# Altium PCB Acoustics.PcbDoc (part 1 of 2)
Units mil, origin at the board's own origin, x right, y up, seen from the top; angles counter-clockwise.
Board outline 6000 x 4000 mil, 4 copper layers (Top Layer, Middle 1, Middle 2, Bottom Layer), stack 23.712 mil thick; 129 components, 90 nets, 526 pads, 20 vias.
Unrouted connection lines stored in the file: 224.
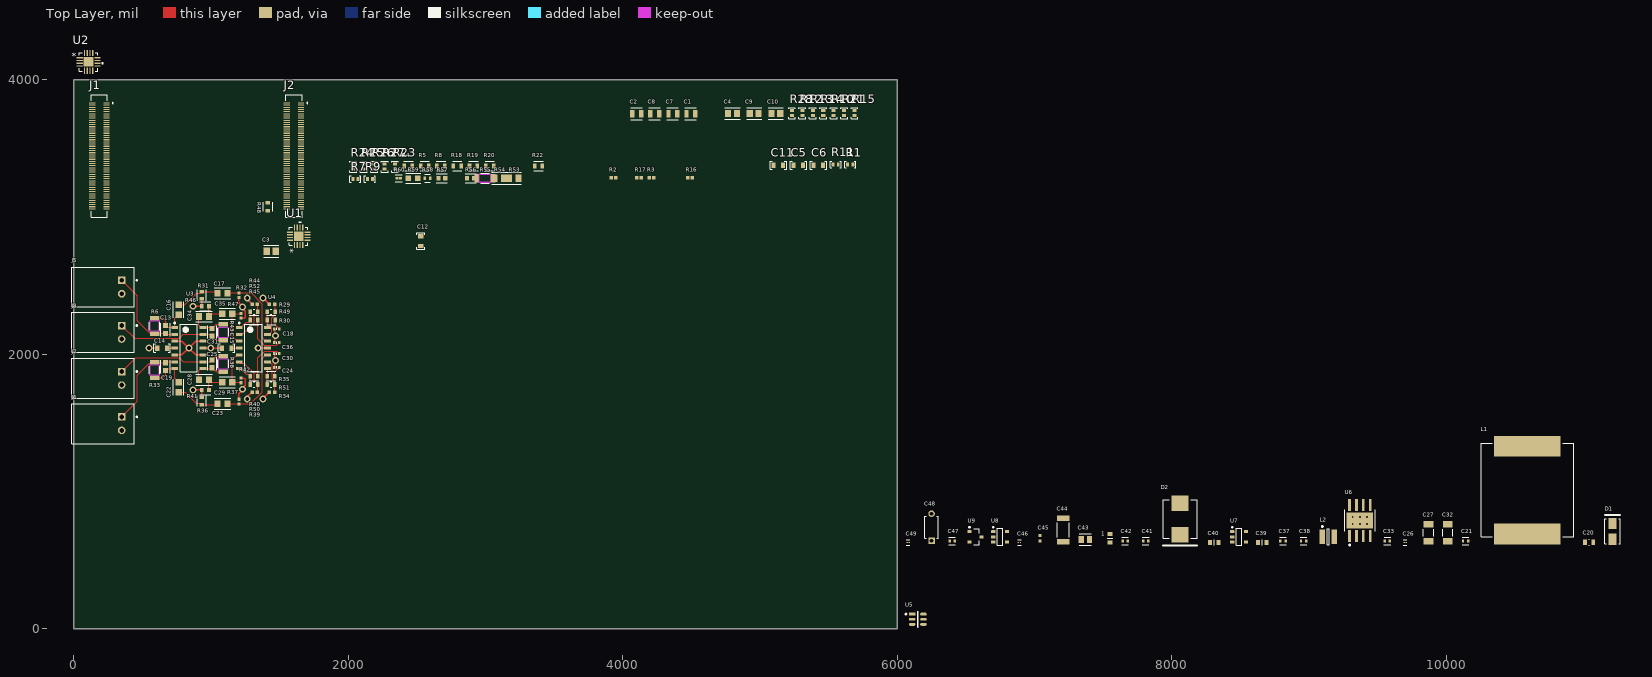
[diagram p0: Top Layer view]
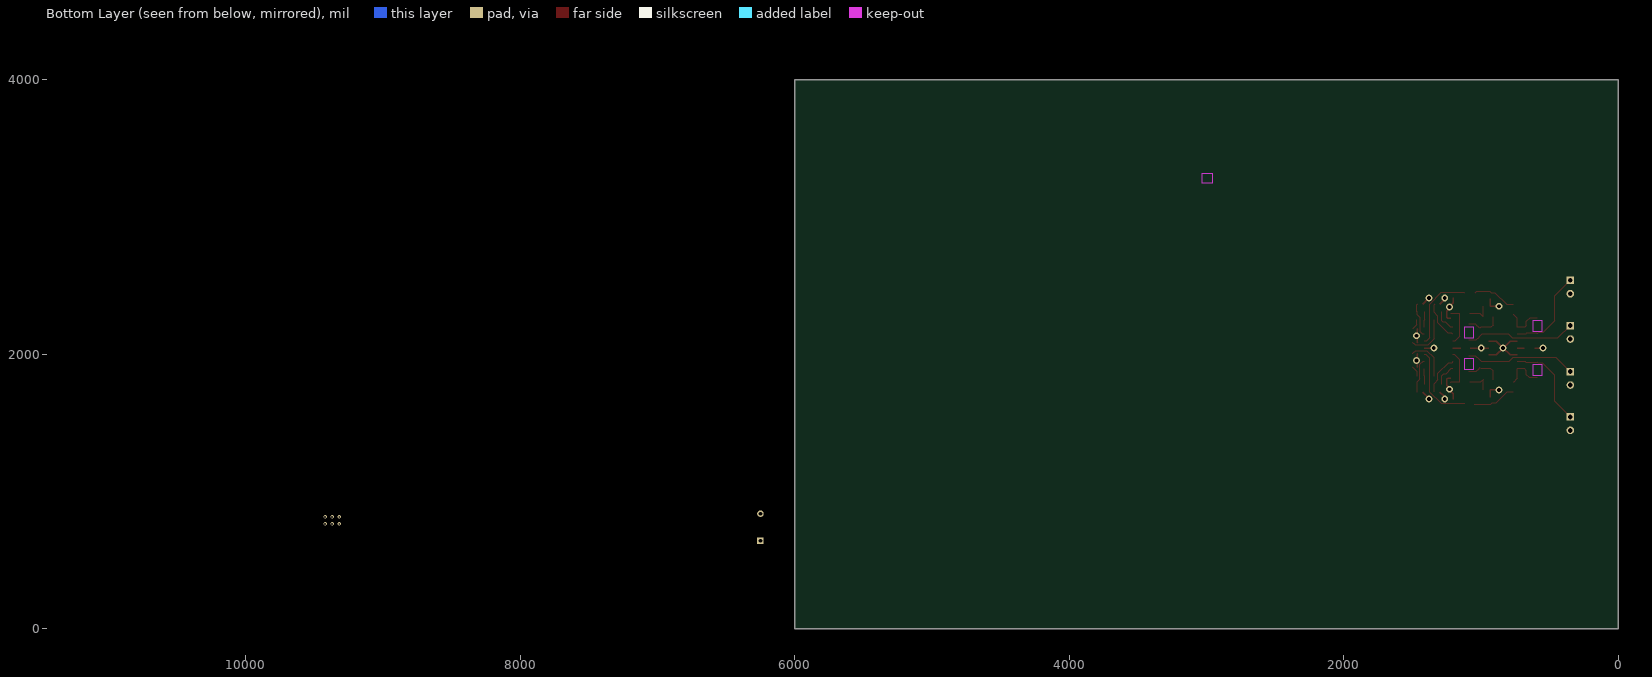
[diagram p1: Bottom Layer view, seen from below]
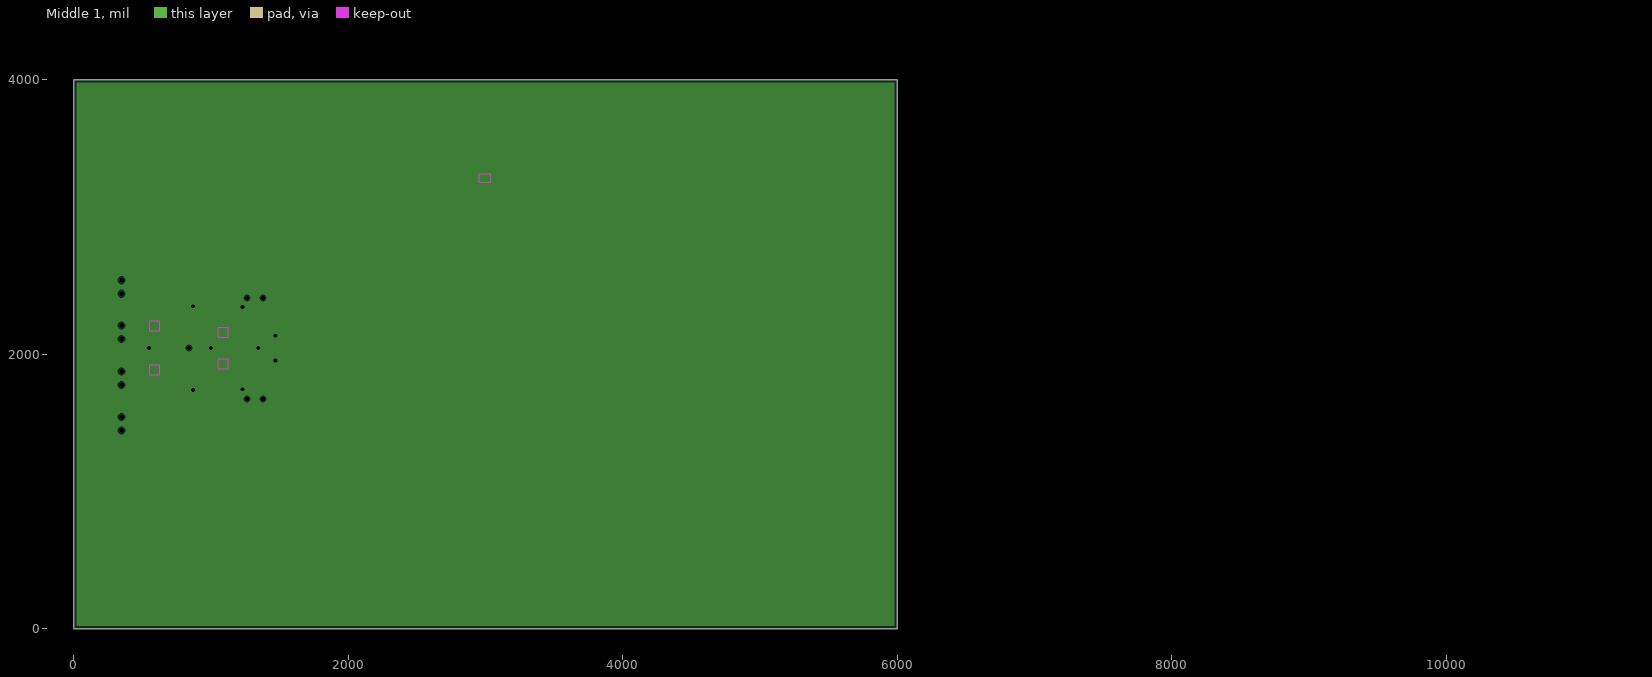
[diagram p2: Middle 1, clearances drawn from the general rule]
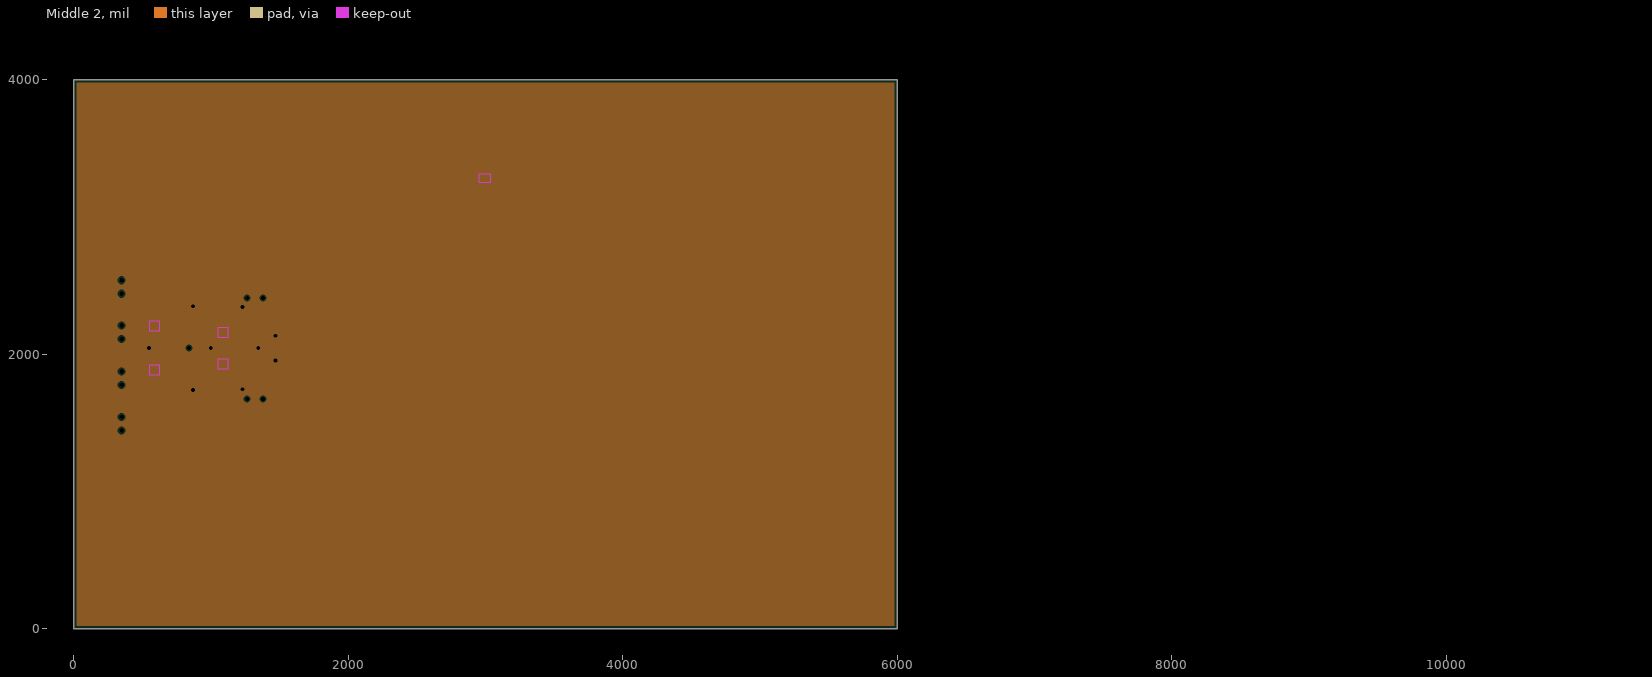
[diagram p3: Middle 2, clearances drawn from the general rule]

## Layer stack, top to bottom
Top Solder: solder mask 0.4, Solder Resist, Dk 3.5
Top Layer: signal copper 1.378
Dielectric 2: prepreg 2.8, PP-006, Dk 4.1
Middle 1: plane copper 1.378, net GND
Dielectric 1: dielectric 12.6, FR-4, Dk 4.8
Middle 2: plane copper 1.378, net GND
Dielectric 3: prepreg 2.8, PP-006, Dk 4.1
Bottom Layer: signal copper 1.378
Bottom Solder: solder mask 0.4, Solder Resist, Dk 3.5

## Board outline
0,0 6000,0 6000,4000 0,4000

## Design rules (kind name [scope] priority, off if disabled: settings)
AcuteAngle [All] p1: minimum=8.00000000000000E+0001 checktracksonly=FALSE
BoardOutlineClearance "BoardOutlineClearance JLCPCB" [All] p1: gap=11.81 ignorepadtopadclearanceinfootprint=FALSE
Clearance "Clearance JLCPCB 4 layer" [All] p1: gap=7.87 ignorepadtopadclearanceinfootprint=FALSE except(3.54: Arc-Arc Arc-Track Track-Track; 5: Arc-SMDPad Arc-Via Track-SMDPad Track-Via SMDPad-SMDPad; 9.45: THPad-THPad THPad-Via Via-Via; 10: Arc-Hole Track-Hole SMDPad-Hole THPad-Hole Via-Hole Fill-Hole Poly-Hole Region-Hole Text-Hole)
DiffPairsRouting "Diff Pairs USB 2.0" [InDifferentialPairClass('USB 2.0')] p1: maxlimit=5 minlimit=5 mostfreqgap=5 toplayer_minwidth=7.87 toplayer_maxwidth=7.87 toplayer_prefwidth=7.87 bottomlayer_minwidth=7.87 bottomlayer_maxwidth=7.87 bottomlayer_prefwidth=7.87 impedanceprofiledriven=TRUE impedanceprofileid={9C1C01C3-81FD-4AE1-9E3D-BC841176F5CA} maxuncoupledlength=500
DiffPairsRouting "Diff Pairs PCIe Gen 2" [InDifferentialPairClass('PCIe Gen 2')] p2: maxlimit=5 minlimit=5 mostfreqgap=5 toplayer_minwidth=5.53 toplayer_maxwidth=5.53 toplayer_prefwidth=5.53 bottomlayer_minwidth=5.53 bottomlayer_maxwidth=5.53 bottomlayer_prefwidth=5.53 impedanceprofiledriven=TRUE impedanceprofileid={D86E5A41-F98B-413D-93FD-A6E48D035561} maxuncoupledlength=500
HoleSize "HoleSize JLCPCB Pad" [IsPad] p1: absolutevalues=TRUE maxlimit=248.03 minlimit=19.68 maxpercent=80.000 minpercent=20.000
HoleSize "HoleSize JLCPCB 4 layer Cheap" [All] p2: absolutevalues=TRUE maxlimit=248.03 minlimit=11.81 maxpercent=80.000 minpercent=20.000
HoleToHoleClearance "HoleToHoleClearance JLCPCB Same Net" [All] p1: gap=10 allowstackedmicrovias=TRUE
MinimumAnnularRing "MinimumAnnularRing JLCPCB Via" [All] p1: minimumring=2.95
MinimumAnnularRing "MinimumAnnularRing JLCPCB Pad" [IsPad] p2: minimumring=9.84
MinimumAnnularRing "MinimumAnnularRing JLCPCB 1oz" [All] p3: minimumring=5.12
MinimumSolderMaskSliver "MinimumSolderMaskSliver JLCPCB" [All] p1: minsoldermaskwidth=3.94
PlaneClearance [All] p1: clearance=11.81
PlaneConnect [All] p1: planeconnectstyle=Direct reliefexpansion=20 reliefentries=4 reliefconductorwidth=10 reliefairgap=10
PolygonConnect [All] p1: connectstyle=Direct reliefconductorwidth=15 reliefentries=4 polygonreliefangle="45 Angle" airgapwidth=10
RoutingVias "RoutingVias JLCPCB 4 layer" [All] p1: holewidth=19.68 width=39.37 viastyle="Through Hole" minholewidth=11.81 minwidth=17.72 maxholewidth=50 maxwidth=80 useviatemplates=TRUE viatemplateguid#1={01536428-1517-4F41-8736-35C18B221FE6} viatemplatename#1=v63h33m63
SilkToSilkClearance [All] p1: silktosilkclearance=3
SilkToSolderMaskClearance "SilkToSolderMaskClearance JLCPCB" [IsPad] p1: minsilkscreentomaskgap=5.91 clearancetoexposedcopper=TRUE
SolderMaskExpansion "SolderMaskExpansion JLCPCB" [All] p1: expansion=1.5 istentingtop=FALSE
SupplyNets "Schematic Supply Nets_5" [InNet('3V3')] p1: voltage=0.000
SupplyNets "Schematic Supply Nets_4" [InNet('Filters 2.5V REF')] p2: voltage=0.000
SupplyNets "Schematic Supply Nets_3" [InNet('Filters + ADC Analog 5V')] p3: voltage=0.000
SupplyNets "Schematic Supply Nets_2" [InNet('GND')] p4: voltage=0.000
SupplyNets "Schematic Supply Nets_1" [InNet('J2 Connectors 5V digital pie')] p5: voltage=0.000
SupplyNets "Schematic Supply Nets" [InNet('VBUS')] p6: voltage=0.000
UnRoutedNet [All] p1: checkbadconnections=TRUE
Width "Width JLCPCB 4 layer" [All] p1: maxlimit=196.85 minlimit=3.54 preferedwidth=9.84 minimp=50.000000 maximp=50.000000 favimp=50.000000
21 further rules are at their usual default settings.

## Classes and differential pairs
component class Power_ACOUSTIC: 1 C20 C21 C26 C27 C32 C33 C37 C38 C39 C40 C41 C42 C43 C44 C45 C46 C47 C48 C49 D1 D2 F1 J3 J4 L1 L2 R53 R54 R55 R56 R57 R58 R59 R60 U5 U6 U7 U8 U9
component class Filters: C13 C14 C15 C16 C17 C18 C19 C22 C23 C24 C25 C28 C29 C30 C31 C34 C35 C36 R6 R29 R30 R31 R32 R33 R34 R35 R36 R37 R38 R39 R40 R41 R42 R43 R44 R45 R46 R47 R49 R50 R51 R52 U3 U4
component class Connectors: J1 J2 J5 J6 J7 J8
component class ADC: C1 C2 C3 C4 C5 C6 C7 C8 C9 C10 C11 C12 R1 R2 R3 R4 R5 R7 R8 R9 R10 R11 R12 R13 R14 R15 R16 R17 R18 R19 R20 R21 R22 R23 R24 R25 R26 R27 R28 R48 U1 U2
differential pair CAN: +CAN_P -CAN_N

## Components (designator, comment, footprint, x,y, rotation, side; value= is the part's Value field where it differs from the comment)
1 "47uF" FP-ZRB18A-0_2-MFG 7550,660 r90 top
C1 "CL21B106KOQNNNE" FP-CL21B106KOQNNNE-MFG 4496.49,3751.77 r0 top value=10uF
C2 "CL21B106KOQNNNE" FP-CL21B106KOQNNNE-MFG 4102.83,3751.77 r0 top value=10uF
C3 "GRM2195C1H103JA01D" FP-GRM219-0_1-IPC_B 1440,2750 r0 top
C4 "GRM2195C1H103JA01D" FP-GRM219-0_1-IPC_B 4799.51,3753.5 r0 top
C5 "10uF Ceramic 6.3V" CAPACITOR_0603 5279.67,3377.51 r0 top
C6 "10uF Ceramic 6.3V" CAPACITOR_0603 5425.67,3377.51 r0 top
C7 "CL21B106KOQNNNE" FP-CL21B106KOQNNNE-MFG 4365.27,3751.77 r0 top value=10uF
C8 "CL21B106KOQNNNE" FP-CL21B106KOQNNNE-MFG 4234.05,3751.77 r0 top value=10uF
C9 "GRM2195C1H103JA01D" FP-GRM219-0_1-IPC_B 4957.79,3753.5 r0 top
C10 "GRM2195C1H103JA01D" FP-GRM219-0_1-IPC_B 5116.06,3753.5 r0 top
C11 "10uF Ceramic 6.3V" CAPACITOR_0603 5133.67,3377.51 r0 top
C12 "10uF Ceramic 6.3V" CAPACITOR_0603 2530,2825 r90 top
C13 "Capacitor 22pF ±1% 110V 0603" FP-GCM188-0_1-IPC_B 670,2180 r90 top value=22pF
C14 "100nF Ceramic 25V" CAPACITOR_0603 645,2045 r180 top value=0.1uF
C15 "100nF Ceramic 25V" CAPACITOR_0603 1115,2045 r180 top value=0.1uF
C16 "Capacitor 0.1uF 2% 50V 0704" FP-GRMJN6-0_1-IPC_A 765,2325 r90 top value=100nF
C17 "Capacitor 0.1uF 2% 50V 0704" FP-GRMJN6-0_1-IPC_A 1085,2445 r0 top value=100nF
C18 "Capacitor 1nF +/-20% 50V 0402" CAPC0402(1005)33_L 1480,2185 r0 top value=1nF
C19 "Capacitor 22pF ±1% 110V 0603" FP-GCM188-0_1-IPC_B 670,1910 r270 top value=22pF
C20 "0.1 uF" FP-GRMJN6-0_1-MFG 11040,630 r0 top
C21 "10uf 50V" FP-ZRB15X-0_22-MFG 10140,640 r0 top
C22 "Capacitor 0.1uF 2% 50V 0704" FP-GRMJN6-0_1-IPC_A 765,1760 r270 top value=100nF
C23 "Capacitor 0.1uF 2% 50V 0704" FP-GRMJN6-0_1-IPC_A 1085,1640 r0 top value=100nF
C24 "Capacitor 1nF +/-20% 50V 0402" CAPC0402(1005)33_L 1480,1905 r0 top value=1nF
C25 "Capacitor 22pF ±1% 110V 0603" FP-GCM188-0_1-IPC_B 1010,1930 r270 top value=22pF
C26 "0.1uF" FP-GRM022-0_02-IPC_C 9700,630 r0 top
C27 "22uF" FP-GCJ31C-0_3-MFG 9870,700 r90 top
C28 "Capacitor 0.1uF 2% 50V 0704" FP-GRMJN6-0_1-IPC_A 950,1815 r0 top value=100nF
C29 "Capacitor 0.1uF 2% 50V 0704" FP-GRMJN6-0_1-IPC_A 1120,1795 r0 top value=100nF
C30 "Capacitor 1nF +/-20% 50V 0402" CAPC0402(1005)33_L 1480,2005 r0 top value=1nF
C31 "Capacitor 22pF ±1% 110V 0603" FP-GCM188-0_1-IPC_B 1010,2160 r90 top value=22pF
C32 "22uF" FP-GCJ31C-0_3-MFG 10010,700 r90 top
C33 "0.1uF" FP-ZRB15X-0_22-MFG 9570,640 r0 top
C34 "Capacitor 0.1uF 2% 50V 0704" FP-GRMJN6-0_1-IPC_A 950,2275 r0 top value=100nF
C35 "Capacitor 0.1uF 2% 50V 0704" FP-GRMJN6-0_1-IPC_A 1120,2295 r0 top value=100nF
C36 "Capacitor 1nF +/-20% 50V 0402" CAPC0402(1005)33_L 1480,2085 r0 top value=1nF
C37 "10uF" FP-ZRB15X-0_22-MFG 8810,640 r0 top
C38 "10uF" FP-ZRB15X-0_22-MFG 8960,640 r0 top
C39 "47uF" FP-ZRB18A-0_2-MFG 8660,630 r0 top
C40 "47uF" FP-ZRB18A-0_2-MFG 8310,630 r0 top
C41 "10uf Cap" FP-ZRB15X-0_22-MFG 7810,640 r0 top
C42 "2.2uF" FP-ZRB155-0_2-MFG 7660,640 r0 top
C43 "10nf" FP-C0805C103K8RACAUTO-MFG 7370,650 r0 top
C44 "68pF" WCAP-CSMH_1808_H1.25 7210,720 r90 top
C45 "4.7nF" WCAP-CSGP_0402_L1W0.5H0.5 7040,660 r90 top
C46 "0.1uF" FP-GRM022-0_02-IPC_C 6890,630 r0 top
C47 "10uF" FP-ZRB15X-0_22-MFG 6400,640 r0 top
C48 "1Uf" FP-RCE1K1-MFG 6250,740 r90 top
C49 "0.1uF" FP-GRM022-0_02-IPC_C 6080,630 r0 top
D1 "SMAJ22A" LFUS-DO-214AC-2_L 11210,710 r90 top
D2 "B560" DIOD-B5X0C-2_M 8060,800 r90 top
J1 "10164227-1004A1RLF" AMPHENOL_10164227-1004A1RLF 188.03,3444.41 r90 top
J2 "10164227-1004A1RLF" AMPHENOL_10164227-1004A1RLF 1605.35,3444.41 r90 top
J5 "S2B-XH-A-GU" FP-S2B-XH-A-GU-MFG 215,2490 r270 top
J6 "S2B-XH-A-GU" FP-S2B-XH-A-GU-MFG 215,1495 r270 top
J7 "S2B-XH-A-GU" FP-S2B-XH-A-GU-MFG 215,1825 r270 top
J8 "S2B-XH-A-GU" FP-S2B-XH-A-GU-MFG 215,2160 r270 top
L1 "15uH" FP-IHLP-6767GZ-FP_3_825x1-MFG 10590,1010 r90 top
L2 "4.7uH" BOUR-SRN3015-2_V 9140,670 r0 top
R1 "0 Ohm 1% 1/16W" RESISTOR_0402 5657.67,3382.51 r0 top
R2 "100m" RESC1005X40X25NL10T10 3932.75,3285.81 r0 top
R3 "100m" RESC1005X40X25NL10T10 4211.25,3285.81 r0 top
R4 "RMCF0603FT10R0" FP-RMCF0603-MFG 2439.21,3371.96 r0 top
R5 "RMCF0603FT10R0" FP-RMCF0603-MFG 2557.64,3371.96 r0 top
R6 "Resistor 47M 1% 0.3W 1206" RES_CRHA1206_VIS 590,2205 r90 top value=47M
R7 "0 Ohm 1% 1/16W" RESISTOR_0402 2053,3276.51 r0 top
R8 "RMCF0603FT10R0" FP-RMCF0603-MFG 2676.06,3371.96 r0 top
R9 "0 Ohm 1% 1/16W" RESISTOR_0402 2159,3276.51 r0 top
R10 "0 Ohm 1% 1/16W" RESISTOR_0402 5537.2,3757 r90 top
R11 "0 Ohm 1% 1/16W" RESISTOR_0402 5551.67,3382.51 r0 top
R12 "0 Ohm 1% 1/16W" RESISTOR_0402 5309.2,3757 r90 top
R13 "0 Ohm 1% 1/16W" RESISTOR_0402 5385.2,3757 r90 top
R14 "0 Ohm 1% 1/16W" RESISTOR_0402 5461.2,3757 r90 top
R15 "0 Ohm 1% 1/16W" RESISTOR_0402 5689.2,3757 r90 top
R16 "100m" RESC1005X40X25NL10T10 4489.76,3285.81 r0 top
R17 "100m" RESC1005X40X25NL10T10 4118.42,3285.81 r0 top
R18 "RMCF0603FT10R0" FP-RMCF0603-MFG 2794.49,3371.96 r0 top
R19 "RMCF0603FT10R0" FP-RMCF0603-MFG 2912.91,3371.96 r0 top
R20 "RMCF0603FT10R0" FP-RMCF0603-MFG 3031.34,3371.96 r0 top
R21 "0 Ohm 1% 1/16W" RESISTOR_0402 5613.2,3757 r90 top
R22 "RMCF0603FT10R0" FP-RMCF0603-MFG 3386.61,3371.96 r0 top
R23 "0 Ohm 1% 1/16W" RESISTOR_0402 2342,3367.51 r90 top
R24 "0 Ohm 1% 1/16W" RESISTOR_0402 2038,3367.51 r90 top
R25 "0 Ohm 1% 1/16W" RESISTOR_0402 2114,3367.51 r90 top
R26 "0 Ohm 1% 1/16W" RESISTOR_0402 2190,3367.51 r90 top
R27 "0 Ohm 1% 1/16W" RESISTOR_0402 2266,3367.51 r90 top
R28 "0 Ohm 1% 1/16W" RESISTOR_0402 5233.2,3757 r90 top
R29 "SG73P1ETTP1001F" RESC1005X40X25ML05T05 1445,2365 r180 top value=1k
R30 "RMCF0603FG22R0" FP-RMCF0603-MFG 1440,2250 r0 top value=22
R31 "Resistor 3.3k 1% 0.2W 0603" FP-AC0603-IPC_C 935,2430 r90 top value=3.3k
R32 "Resistor 33K 1% 0.063W 0402" RESC1005X40X25NL05T10 1205,2430 r90 top value=33k
R33 "Resistor 47M 1% 0.3W 1206" RES_CRHA1206_VIS 590,1885 r270 top value=47M
R34 "SG73P1ETTP1001F" RESC1005X40X25ML05T05 1445,1725 r180 top value=1k
R35 "RMCF0603FG22R0" FP-RMCF0603-MFG 1438.54,1840 r0 top value=22
R36 "Resistor 3.3k 1% 0.2W 0603" FP-AC0603-IPC_C 935,1660 r270 top value=3.3k
R37 "Resistor 33K 1% 0.063W 0402" RESC1005X40X25NL05T10 1205,1655 r270 top value=33k
R38 "Resistor 47M 1% 0.3W 1206" RES_CRHA1206_VIS 1090,1930 r270 top value=47M
R39 "SG73P1ETTP1001F" RESC1005X40X25ML05T05 1320,1725 r180 top value=1k
R40 "RMCF0603FG22R0" FP-RMCF0603-MFG 1315,1840 r0 top value=22
R41 "Resistor 3.3k 1% 0.2W 0603" FP-AC0603-IPC_C 960,1740 r0 top value=3.3k
R42 "Resistor 33K 1% 0.063W 0402" RESC1005X40X25NL05T10 1220,1810 r270 top value=33k
R43 "Resistor 47M 1% 0.3W 1206" RES_CRHA1206_VIS 1090,2160 r90 top value=47M
R44 "SG73P1ETTP1001F" RESC1005X40X25ML05T05 1320,2365 r180 top value=1k
R45 "RMCF0603FG22R0" FP-RMCF0603-MFG 1315,2250 r0 top value=22
R46 "Resistor 3.3k 1% 0.2W 0603" FP-AC0603-IPC_C 960,2350 r0 top value=3.3k
R47 "Resistor 33K 1% 0.063W 0402" RESC1005X40X25NL05T10 1220,2280 r90 top value=33k
R48 "RMCF0603FT10R0" FP-RMCF0603-MFG 1415,3075 r270 top
R49 "RT0603LRC07100KL" RESC1608X55N 1440,2310 r180 top value=100k
R50 "RT0603LRC07100KL" RESC1608X55N 1315,1780 r180 top value=100k
R51 "RT0603LRC07100KL" RESC1608X55N 1438.05,1780 r180 top value=100k
R52 "RT0603LRC07100KL" RESC1608X55N 1315,2310 r180 top value=100k
R53 "100k ohm" FP-RQ73C2A-IPC_B 3206.13,3281.87 r0 top
R54 "100k" FP-RQ73C2A-IPC_B 3101.49,3281.87 r0 top
R55 "20k" "MCA 1206_VIS" 2996.84,3281.87 r0 top
R56 "52.3K" FP-MCR03-IPC_C 2892.2,3281.87 r0 top
R57 "22k" FP-CRGP0603-IPC_C 2682.91,3281.87 r0 top value=22KΩ
R58 "162k" FP-RP73P-1E-MFG 2578.26,3281.87 r0 top value=162KΩ
R59 "10K" FP-AC0603-IPC_A 2473.61,3281.87 r0 top
R60 "20 Ohm" FP-AF0201-IPC_A 2368.97,3281.87 r0 top
U1 "ADS7253IRTET" WQFN-16 1640,2860 r90 top
U2 "ADS7253IRTET" WQFN-16 109.8,4129.8 r0 top
U3 "OPA4228UA" D0014A_L 840,2045 r0 top
U4 "OPA4228UA" D0014A_L 1310,2045 r0 top
U5 "TPS560430XFDBVR" FP-DBV0006A-IPC_C 6150,70 r0 top
U6 "TPS54560BDDAR" FP-DDA0008E-MFG 9370,790 r90 top
U7 "LP2985-50DBVRG4" DBV0005A_L 8490,670 r0 top
U8 "OPA376AIDBVR" DBV0005A_L 6750,670 r0 top
U9 "REF3025AIDBZR" DBZ0003A_L 6570,670 r0 top

## Footprints (in the part's own frame and the unit in brackets; to place one, negate y for a bottom-side part, rotate by r counter-clockwise, add the part's x,y. Pads: shape width x height; smd on the part's side, far side on the other; paste and mask are expansions set on the pad)
AMPHENOL_10164227-1004A1RLF [mm]
  rect 0.2x1.14 smd paste-2 mask+0: 1(9.8,-1.32) 2(9.8,1.32) 3(9.4,-1.32) 4(9.4,1.32) 5(9,-1.32) 6(9,1.32) 7(8.6,-1.32) 8(8.6,1.32) 9(8.2,-1.32) 10(8.2,1.32) 11(7.8,-1.32) 12(7.8,1.32) 13(7.4,-1.32) 14(7.4,1.32) 15(7,-1.32) 16(7,1.32) 17(6.6,-1.32) 18(6.6,1.32) 19(6.2,-1.32) 20(6.2,1.32) 21(5.8,-1.32) 22(5.8,1.32) 23(5.4,-1.32) 24(5.4,1.32) 25(5,-1.32) 26(5,1.32) 27(4.6,-1.32) 28(4.6,1.32) 29(4.2,-1.32) 30(4.2,1.32) 31(3.8,-1.32) 32(3.8,1.32) 33(3.4,-1.32) 34(3.4,1.32) 35(3,-1.32) 36(3,1.32) 37(2.6,-1.32) 38(2.6,1.32) 39(2.2,-1.32) 40(2.2,1.32) 41(1.8,-1.32) 42(1.8,1.32) 43(1.4,-1.32) 44(1.4,1.32) 45(1,-1.32) 46(1,1.32) 47(0.6,-1.32) 48(0.6,1.32) 49(0.2,-1.32) 50(0.2,1.32) 51(-0.2,-1.32) 52(-0.2,1.32) 53(-0.6,-1.32) 54(-0.6,1.32) 55(-1,-1.32) 56(-1,1.32) 57(-1.4,-1.32) 58(-1.4,1.32) 59(-1.8,-1.32) 60(-1.8,1.32) 61(-2.2,-1.32) 62(-2.2,1.32) 63(-2.6,-1.32) 64(-2.6,1.32) 65(-3,-1.32) 66(-3,1.32) 67(-3.4,-1.32) 68(-3.4,1.32) 69(-3.8,-1.32) 70(-3.8,1.32) 71(-4.2,-1.32) 72(-4.2,1.32) 73(-4.6,-1.32) 74(-4.6,1.32) 75(-5,-1.32) 76(-5,1.32) 77(-5.4,-1.32) 78(-5.4,1.32) 79(-5.8,-1.32) 80(-5.8,1.32) 81(-6.2,-1.32) 82(-6.2,1.32) 83(-6.6,-1.32) 84(-6.6,1.32) 85(-7,-1.32) 86(-7,1.32) 87(-7.4,-1.32) 88(-7.4,1.32) 89(-7.8,-1.32) 90(-7.8,1.32) 91(-8.2,-1.32) 92(-8.2,1.32) 93(-8.6,-1.32) 94(-8.6,1.32) 95(-9,-1.32) 96(-9,1.32) 97(-9.4,-1.32) 98(-9.4,1.32) 99(-9.8,-1.32) 100(-9.8,1.32)
  silkscreen extent -11.3,-2.6 11.3,1.5, body extent -11.3,-1.69 11.3,1.69, height 4.1
BOUR-SRN3015-2_V [mm] "SMD, 2-Leads, Body 3x3mm, Height 1.5mm"
  rect 1x2.7 smd: 1(-1.1,0) 2(1.1,0)
  silkscreen extent -1.22,-1.5 0.2,2.02, body extent -1.5,-1.5 1.5,1.5, height 1.5
CAPACITOR_0603 [mil] "CAPACITOR 0603"
  rect 30x40 smd: 1(-35,0) 2(35,0)
  silkscreen extent -60,-30 60,30, body extent -31,-16 32,16, height 31
CAPC0402(1005)33_L [mm] "Chip Capacitor, Body 1.0x0.5mm, Height 0.33mm, IPC High Density"
  rrect25% 0.5x0.55 smd: 1(-0.45,0) 2(0.45,0)
  silkscreen extent 0,-0.2 0,0.2, body extent -0.5,-0.25 0.5,0.25, height 0.55
D0014A_L [mm] "SOIC, 14-Leads, Body 8.75x4mm, Pitch 1.27mm, IPC High Density"
  rrect18% 1.25x0.55 smd: 1(-2.625,3.81) 2(-2.625,2.54) 3(-2.625,1.27) 4(-2.625,0) 5(-2.625,-1.27) 6(-2.625,-2.54) 7(-2.625,-3.81) 8(2.625,-3.81) 9(2.625,-2.54) 10(2.625,-1.27) 11(2.625,0) 12(2.625,1.27) 13(2.625,2.54) 14(2.625,3.81)
  silkscreen extent -2.75,-4.38 1.6,4.76, body extent -3.02,-4.32 3.02,4.32, height 1.59
DBV0005A_L [mm] "SOT23, 5-Leads, Body 3.05x1.75mm, Pitch 0.95mm, IPC High Density"
  rrect18% 0.8x0.55 smd: 1(-1.275,0.95) 2(-1.275,0) 3(-1.275,-0.95) 4(1.275,-0.95) 5(1.275,0.95)
  silkscreen extent -1.4,-1.55 0.5,1.9, body extent -1.42,-1.46 1.42,1.46, height 1.08
DBZ0003A_L [mm] "SOT23, 3-Leads, Body 3.04x1.4mm, Pitch 0.95mm, IPC High Density"
  rrect18% 0.8x0.55 smd: 1(-1.1,0.95) 2(-1.1,-0.95) 3(1.1,0)
  silkscreen extent -1.22,-1.5 0.7,1.9, body extent -1.26,-1.46 1.26,1.46, height 0.96
DIOD-B5X0C-2_M [mm] "Molded Diode, 2-Leads, Body 7.11x6.22mm, IPC Low Density"
  rect 2.85x3.2 smd: 1(-2.95,0) 2(2.95,0)
  silkscreen extent -4.87,-3.15 3.6,3.15, body extent -3.56,-3.11 3.55,3.11, height 2.63
FP-AC0603-IPC_A [mil]
  rect 41.68x39.85 smd paste+0 mask+0: 1(-34.52,0) 2(34.52,0)
  silkscreen extent -55,-36 55,36, body extent -75,-40 75,40, height 10
FP-AC0603-IPC_C [mil]
  rect 25.93x31.97 smd paste+0 mask+0: 1(-26.64,0) 2(26.64,0)
  silkscreen extent -40,-33 40,33, body extent -44,-22 44,22, height 10
FP-AF0201-IPC_A [mil]
  rect 21.82x18.22 smd paste+0 mask+0: 1(-13.95,0) 2(13.95,0)
  silkscreen extent -25,-25 25,25, body extent -33,-17 33,17, height 10
FP-C0805C103K8RACAUTO-MFG [mm]
  rect 0.95x1.35 smd paste+0 mask+0: 1(-0.75,0) 2(0.75,0)
  silkscreen extent -1.1,-1.05 1.1,1.05, body extent -1.4,-0.85 1.4,0.85, height 0.25
FP-CL21B106KOQNNNE-MFG [mm]
  rect 0.825x1.325 smd paste+0 mask+0: 1(-0.8,0) 2(0.8,0)
  silkscreen extent -1.13,-1.14 1.05,1.12, body extent -1.31,-0.8 1.31,0.8, height 0.25
FP-CRGP0603-IPC_C [mil]
  rect 29.85x31.97 smd paste+0 mask+0: 1(-24.68,0) 2(24.68,0)
  silkscreen extent -40,-33 40,33, body extent -44,-22 44,22, height 10
FP-DBV0006A-IPC_C [mm]
  rect 1.205x0.53 smd paste+0 mask+0: 1(-1.05,0.95)
  rrect100% 1.205x0.53 smd paste+0 mask+0: 2(-1.05,0) 3(-1.05,-0.95) 4(1.05,-0.95) 5(1.05,0) 6(1.05,0.95)
  silkscreen extent -2.33,-1.45 0.05,1.45, body extent -1.75,-1.55 1.75,1.55, height 0.25
FP-DDA0008E-MFG [mm]
  rect 2.2x0.5 smd paste-1000 mask+0: 1(-2.875,1.905) 2(-2.875,0.635) 3(-2.875,-0.635) 4(-2.875,-1.905) 5(2.875,-1.905) 6(2.875,-0.635) 7(2.875,0.635) 8(2.875,1.905)
  rect 2.95x4.9 smd paste-1000 mask-1000: 9(0,0)
  silkscreen extent -4.67,-2.83 2,2.83, body extent -4.08,-2.68 4.08,2.68, height 0.25
FP-GCJ31C-0_3-MFG [mm]
  rect 1.15x1.8 smd paste+0 mask+0: 1(-1.575,0) 2(1.575,0)
  silkscreen extent -0.63,-0.95 0.63,0.95, body extent -2.25,-1.05 2.25,1.05, height 0.25
FP-GCM188-0_1-IPC_B [mil]
  rect 37.74x35.91 smd paste+0 mask+0: 1(-28.61,0) 2(28.61,0)
  silkscreen extent -47,-34 47,34, body extent -57,-28 57,28, height 10
FP-GRM022-0_02-IPC_C [mil]
  rect 10.06x6.35 smd paste+0 mask+0: 1(-7.98,0) 2(7.98,0)
  silkscreen extent -13,-20 13,20, body extent -17,-8 17,8, height 10
FP-GRM219-0_1-IPC_B [mil]
  rect 45.58x53.63 smd paste+0 mask+0: 1(-32.57,0) 2(32.57,0)
  silkscreen extent -55,-43 55,43, body extent -65,-37 65,37, height 10
FP-GRMJN6-0_1-IPC_A [mil]
  rect 45.62x47.72 smd paste+0 mask+0: 1(-36.48,0) 2(36.48,0)
  silkscreen extent -59,-40 59,40, body extent -79,-44 79,44, height 10
FP-GRMJN6-0_1-MFG [mm]
  rect 0.7x1 smd paste+0 mask+0: 1(-0.775,0) 2(0.775,0)
  silkscreen extent -0.05,-0.55 0.05,0.55, body extent -1.22,-0.65 1.22,0.65, height 0.25
FP-IHLP-6767GZ-FP_3_825x1-MFG [mm]
  rect 3.825x12.32 smd paste+0 mask+0: 1(-8.117,0) 2(8.117,0)
  silkscreen extent -8.64,-8.57 8.64,8.57, body extent -10.13,-8.67 10.13,8.67, height 0.25
FP-MCR03-IPC_C [mil]
  rect 29.85x31.97 smd paste+0 mask+0: 1(-24.68,0) 2(24.68,0)
  silkscreen extent -40,-33 40,33, body extent -44,-22 44,22, height 10
FP-RCE1K1-MFG [mm]
  rect 1.2x1.2 hole 0.7: 1(-2.5,0)
  round 1.2 hole 0.7: 2(2.5,0)
  silkscreen extent -2,-1.25 2,1.25, body extent -3.2,-1.35 3.2,1.35, height 0.25
FP-RMCF0603-MFG [mm]
  rect 0.65x0.9 smd paste+0 mask+0: 1(-0.725,0) 2(0.725,0)
  silkscreen extent -0.85,-0.88 0.85,0.88, body extent -1.15,-0.58 1.15,0.58, height 0.25
FP-RP73P-1E-MFG [mm]
  rect 0.5x0.6 smd paste+0 mask+0: 1(-0.5,0) 2(0.5,0)
  silkscreen extent -0.53,-0.77 0.53,0.75, body extent -0.85,-0.4 0.85,0.4, height 0.25
FP-RQ73C2A-IPC_B [mil]
  rect 41.66x53.63 smd paste+0 mask+0: 1(-34.53,0) 2(34.53,0)
  silkscreen extent -55,-43 55,43, body extent -65,-37 65,37, height 10
FP-S2B-XH-A-GU-MFG [mm]
  rect 1.4x1.4 hole 0.9 paste-2539.97 mask+0: 1(-1.25,3.45)
  round 1.4 hole 0.9 paste-2539.97 mask+0: 2(1.25,3.45)
  silkscreen extent -3.7,-5.75 3.7,6.38, body extent -3.8,-5.85 3.8,5.85, height 0.25
FP-ZRB15X-0_22-MFG [mm]
  rect 0.45x0.6 smd paste+0 mask+0: 1(-0.475,0) 2(0.475,0)
  silkscreen extent -0.62,-0.72 0.61,0.7, body extent -0.8,-0.45 0.8,0.45, height 0.25
FP-ZRB18A-0_2-MFG [mm]
  rect 0.75x0.9 smd paste+0 mask+0: 1(-0.775,0) 2(0.775,0)
  silkscreen extent 0,-0.5 0,0.5, body extent -1.25,-0.6 1.25,0.6, height 0.25
FP-ZRB155-0_2-MFG [mm]
  rect 0.45x0.6 smd paste+0 mask+0: 1(-0.475,0) 2(0.475,0)
  silkscreen extent -0.6,-0.72 0.6,0.72, body extent -0.8,-0.45 0.8,0.45, height 0.25
LFUS-DO-214AC-2_L [mm] "Molded Diode, 2-Leads, Body 4.6x2.79mm, IPC High Density"
  rect 2.1x1.45 smd: 1(-1.45,0) 2(1.45,0)
  silkscreen extent -2.3,-1.4 3,1.4, body extent -2.52,-1.4 2.52,1.4, height 2.29
"MCA 1206_VIS" [mil]
  rect 34x63 smd paste+0 mask+0: 1(-59,0) 2(59,0)
  Top Layer keep-out region: -40,-29.5 -40,29.5 40,29.5 40,-29.5
  Keep-Out Layer region: -40,-31.5 -40,31.5 40,31.5 40,-31.5
  silkscreen extent -30,-36 30,36, body extent -62,-31 62,31, height 22
RES_CRHA1206_VIS [mil]
  rect 33x69 smd paste+0 mask+0: 1(-57,0) 2(57,0)
  Top Layer keep-out region: -38.5,-32.5 -38.5,32.5 38.5,32.5 38.5,-32.5
  Keep-Out Layer region: -38.5,-34.5 -38.5,34.5 38.5,34.5 38.5,-34.5
  silkscreen extent -28,-40 28,40, body extent -66,-34 66,34, height 29
RESC1005X40X25ML05T05 [mm] "Chip Resistor, 2-Leads, Body 1.05x0.55mm, IPC Low Density"
  rect 0.65x0.65 smd: 1(-0.5,0) 2(0.5,0)
  body extent -0.53,-0.28 0.53,0.28, height 0.4
RESC1005X40X25NL05T10 [mm] "Chip Resistor, 2-Leads, Body 1.00x0.50mm, IPC Medium Density"
  rect 0.6x0.55 smd: 1(-0.425,0) 2(0.425,0)
  body extent -0.53,-0.27 0.53,0.28, height 0.4
RESC1005X40X25NL10T10 [mm] "Chip Resistor, 2-Leads, Body 1.00x0.50mm, IPC Medium Density"
  rect 0.65x0.6 smd: 1(-0.425,0) 2(0.425,0)
  body extent -0.55,-0.3 0.55,0.3, height 0.4
RESC1608X55N [mm] "Chip Resistor, 2-Leads, Body 1.58x0.83mm, IPC Medium Density"
  rrect25% 0.625x0.9 smd: 1(-0.713,0) 2(0.713,0)
  silkscreen extent -0.14,-0.49 0.14,0.49, body extent -0.79,-0.41 0.79,0.41, height 0.55
RESISTOR_0402 [mm] "Resistor 0402"
  rect 0.55x0.75 smd: 1(-0.475,0) 2(0.475,0)
  silkscreen extent -1.02,-0.64 1.02,0.64, body extent -0.5,-0.25 0.5,0.25, height 0.25
WCAP-CSGP_0402_L1W0.5H0.5 [mm] "Ceramic Capacitors, body 1x0.5mm"
  rect 0.5x0.5 smd: 1(-0.5,0) 2(0.5,0)
  body extent -0.5,-0.25 0.5,0.25, height 0.5
WCAP-CSMH_1808_H1.25 [mm] "Ceramic Capacitors, body 4.5x2.03mm"
  rect 1.05x2.3 smd: 1(-2.175,0) 2(2.175,0)
  silkscreen extent -1.3,-1.14 1.3,1.14, body extent -2.25,-1.01 2.25,1.01, height 1.25
WQFN-16 [mm]
  rect 1.155x0.229 smd paste+0 mask+0: 1(-1.627,0.75) 2(-1.627,0.25) 3(-1.627,-0.25) 4(-1.627,-0.75) 9(1.627,-0.75) 10(1.627,-0.25) 11(1.627,0.25) 12(1.627,0.75)
  rect 0.229x1.155 smd paste+0 mask+0: 5(-0.75,-1.627) 6(-0.25,-1.627) 7(0.25,-1.627) 8(0.75,-1.627) 13(0.75,1.627) 14(0.25,1.627) 15(-0.25,1.627) 16(-0.75,1.627)
  rect 1.8x1.8 smd paste+0 mask+0: 17(0,0)
  silkscreen extent -1.7,-1.7 2.71,1.7, body extent -1.9,-1.9 1.9,1.9, height 1.65

## Part data
1 C39 C40: library part CMP-06035-063273-1, "Low Acoustic Noise Chip Multilayer Ceramic Capacitors on Interposer Board for General Purpose 	47μF ±20% 2.5VDC SMD 0603"
C1 C2 C7 C8: library part CMP-2000-06106-2, "CAP CER 10UF 16V X7R 0805", Capacitance=10uF, Manufacturer="Samsung Electro-Mechanics America, Inc", Temperature="-55°C to +125°C", Temperature Characteristic=X7R, Temperature Coefficient=15%, Temperature Range High=+125°C, Temperature Range Low=-55°C, Tolerance=10%, Voltage Rating=16V, Automotive=No, Category=Cap, ComponentLink2Description=Datasheet, ComponentLink2URL=http://www.samsungsem.com/servlet/FileDownload?path=productsearch&sname=CL21B106KOQNNNE.pdf&oname=CL21B106KOQNNNE.pdf, Device Class L1="Passive Components", Device Class L2=Capacitors, Device Class L3="Ceramic Capacitors", Digikey Description="CAP CER 10UF 16V X7R 0805", Height=1.4mm, Ipc Land Pattern Name=CAPC200125X125, Lead Free=Yes, Manufacturer Part Number=CL21B106KOQNNNE, Material=Ceramic, Octopart=https://octopart.com/cl21b106koqnnne-samsung-19832289, Package=CL21B106KOQNNNE, RoHS=TRUE
C3 C4 C9 C10: library part CMP-2007-00135-2, "Chip Multilayer Ceramic Capacitors for General Purpose, 0805, 10000pF, C0G, 30ppm/°C, 5%, 50V", Capacitance=10nF, Case Code (Imperial)=0805, Case Code (Metric)=2012, Dielectric=C0G, Dielectric Material=Ceramic, Insulation Resistance=10GR, Max Operating Temperature=125°C, Min Operating Temperature=-55°C, Package Quantity=1, Temperature Coefficient=30ppm/°C, Tolerance=5%, Voltage=50V, Case/Package=0805, Depth=1.25mm, Height=0.85mm, Lead Free="Lead Free", Length=2mm, Material=Ceramic, Mount="Surface Mount", Number of Pins=2, Packaging="Tape and Reel", Radiation Hardening=No, REACH SVHC="No SVHC", Termination=SMD/SMT, Thickness=0.037inch, Voltage Rating=50V, Voltage Rating (DC)=50V, Width=0.049inch
C5 C6 C11 C12: library part CAPACITOR_10uF_0603, "Cap 10uF 6.3V +/-20% / Ceramic 0603", Supplier Part Number 1=1276-1119-1-ND, Tolerance="+/- 20%", Value (uF)="10 uF", Voltage=6.3V, ComponentLink1Description=Digikey, ComponentLink1URL=https://www.digikey.com/en/products/detail/samsung-electro-mechanics/CL10A106MQ8NNNC/3886777, Made By="Flip B", Supplier 1=Digi-Key
C13 C19 C25 C31: library part CMP-001-00084-2, "CAP CER 22PF 100V C0G/NP0 0603 / 22 pF ±1% 100V Ceramic Capacitor C0G, NP0 0603 (1608 Metric)", Capacitance=22pF, Case/Package=0603, Dielectric Material=Ceramic, Manufacturer Lifecycle Status="IN PRODUCTION", Max Operating Temperature=125°C, Min Operating Temperature=-55°C, Ratings=AEC-Q200, Temperature Coefficient=30ppm/°C, Tolerance=1%, Voltage Rating=100V, Height=800µm, Length=1.6mm, Lifecycle Status=Production, Material=Ceramic, Mount="Surface Mount", Number of Terminals=2, REACH SVHC=Unaffected, RoHS=Compliant, Schedule B="8532240020, 8532240020", Thickness=800µm, Voltage Rating (DC)=100V, Width=800µm
C14 C15: library part CAPACITOR_0.1uF_0603_25V, "Cap 100nF 25V +/-10% / Ceramic 0603", Supplier Part Number 1=1276-1006-1-ND, Tolerance="+/- 10%", Voltage=6.3V, ComponentLink1Description=Datsheet, ComponentLink1URL=https://www.mouser.com/datasheet/2/212/KEM_C1002_X7R_SMD-1102033.pdf, Made By="Flip B", Supplier 1=Digikey
C16 C17 C22 C23 C28 C29 C34 C35: library part CMP-001-00090-3, "Multilayer Ceramic Capacitors MLCC - SMD/SMT 0704 C0G 0.1 uF 2 50VDC GRMJN65C1H104GE01D", Capacitance=100nF, Case/Package=0704, Dielectric Material=Ceramic, Max Operating Temperature=125°C, Min Operating Temperature=-55°C, Temperature Coefficient=30ppm/°C, Tolerance=2%, Voltage Rating=50V, Height=600µm, Length=1.8mm, Lifecycle Status=Production, Material=Ceramic, Mount="Surface Mount", Number of Terminals=2, REACH SVHC=Unaffected, RoHS=Compliant, Voltage Rating (DC)=50V, Width=1mm
C18 C24 C30 C36: library part CMP-001-00066-3, "Chip Capacitor, 1nF +/-20%, 50V, 0402, Thickness 0.33 mm", Case/Package=0402, Max Operating Temperature=85°C, Min Operating Temperature=-55°C, Tolerance=10%, Voltage Rating=50V, Mounting Technology=SMT, Pins=2
C20: library part CMP-00260-135708739-1, "GRMJN65C1H104JE01D Multilayer Ceramic Capacitor, 0.1 uF, 50 V, ± 5%, C0G (NP0), 0704 [1810 Metric]", Capacitance=100nF, Case/Package=0704, Max Operating Temperature=125°C, Min Operating Temperature=-55°C, Temperature Coefficient=30ppm/°C, Tolerance=5%, Voltage Rating=50V, Height=650µm, Lifecycle Status=Production, Material=Ceramic, NexarPartId=135708739
C21 C33 C37 C38 C41 C47: library part CMP-06035-063245-1, "Multilayer Ceramic Capacitors on Interposer Board for General Purpose 10μF ±20% 4VDC X6S  SMD  0402"
C26 C46 C49: library part CMP-06035-051810-1, "Chip Multilayer Ceramic Capacitors for General Purpose, 01005, 0.10uF, X5R, 15%, 20%, 10V"
C27 C32: library part CMP-06035-003359-1, "Cap Ceramic 22uF 10V X7R 20% Pad SMD 1206 Soft Termination  +125°C Automotive T/R"
C42: library part CMP-06035-063357-1, "Low Acoustic Noise Chip Multilayer Ceramic Capacitors on Interposer Board for General Purpose ZRB Series 0402 Package X5R @ 15% 25Vdc 2.2uF @ 20%"
C43: library part CMP-00212-126448506-1, "C0805C103K8RACAUTO Cap, 0.01UF, 10V, Mlcc, 0805 Rohs Compliant: Yes", Capacitance=10nF, Case/Package=0805, Dielectric=X7R, Max Operating Temperature=125°C, Min Operating Temperature=-55°C, Tolerance=10%, Voltage Rating=10V, Height=880µm, Material=Ceramic, NexarPartId=126448506, RoHS=Compliant, Voltage Rating (DC)=10V
C44: library part CMP-03913-89205720-2, "Cap Ceramic 68pF 3000V C0G 5% Pad SMD 1808 125C T/R", Insulation Resistance=10GΩ, Max Operating Temperature=125°C, Min Operating Temperature=-55°C, Voltage Rating=3kV, Capacitance=68pF, Height=1.25mm, Length=4.5mm, RoHS=Compliant, Voltage Rating (DC)=3kV, Width=2.03mm
C45: library part CMP-03913-53703202-2, "Cap Ceramic 0.0047uF 50V X7R 10% Pad SMD 0402 125C T/R", Case Code (Imperial)=0402, Case Code (Metric)=1005, Insulation Resistance=10GΩ, Max Operating Temperature=125°C, Min Operating Temperature=-55°C, Tolerance=10%, Voltage Rating=50V, Capacitance=4.7nF, Case/Package=0402, Height=500µm, Length=1mm, Material=Ceramic, Mount="Surface Mount", Packaging="Tape & Reel (TR)", RoHS=Compliant, Thickness=558.8µm, Width=500µm
C48: library part CMP-00260-148573931-1, "RCEC72A105K1K1H03B", Capacitance=1µF, Case/Package=Radial, Max Operating Temperature=125°C, Min Operating Temperature=-55°C, Tolerance=10%, Voltage Rating=100V, Height=5mm, Lifecycle Status=Production, Material=Ceramic
D1: library part CMP-2000-07086-1, "Transient Voltage Suppression Diode, 400 W, 22 V, -65 to 150 degC, 2-Pin SMD, RoHS, Tape and Reel", Breakdown Voltage-Max=26.9V, Breakdown Voltage-Min=24.4V, Clamping Voltage-Max=35.5V, Manufacturer=Littelfuse, Package Description="2-Pin Surface Mount Device, Body 4.295 x 2.595 mm", Package Reference=DO-214AC, Power Dissipation=400W, Datasheet URL=http://www.littelfuse.com/~/media/electronics/datasheets/tvs_diodes/littelfuse_tvs_diode_smaj_datasheet.pdf.pdf, Datasheet Version=11/2015, Directional=Uni-Directional, Manufacturer URL=http://www.littelfuse.com/, Mounting Technology=SurfaceMount
D2: library part CMP-2000-05098-2, "Schottky Barrier Rectifier, 5 A, 60 V, -55 to 125 degC, 2-Pin SMD, RoHS, Tape and Reel", If - Forward Current=5A, Ifsm - Forward Surge Current=100A, Ir - Reverse Current=500uA, Manufacturer=DiodesIncorporated, Maximum Operating Temperature=+125C, Minimum Operating Temperature=-55C, Operating Temperature Range=-55Cto+125C, Package / Case=SMC, Vf - Forward Voltage=0.7V, Vrrm - Repetitive Reverse Voltage=60V, Brand=DiodesIncorporated, Configuration=Single, Datasheet URL=https://datasheet.ciiva.com/27052/1538961-27052355.pdf, Datasheet Version="Rev. 7-2, 06/2007", Factory Pack Quantity=3000, Height=2.5mm, Length=7.11mm, Manufacturer URL=http://www.diodes.com/, Mounting Style=SMD/SMT, Packaging=Reel, Product=SchottkyDiodes, Product Category=SchottkyDiodes&Rectifiers, RoHS=True, Series=B560, Technology=Si, Termination Style=SMD/SMT, Type=SchottkyBarrierRectifier, Unit Weight=0.007408oz, Width=6.22mm
J1 J2: library part CMP-003-000000-1, "BergStak 0.40mm, 100 position, Receptacle, 4mm stack height", Package=None, Check_prices=https://www.snapeda.com/parts/101642271004A1RLF/Amphenol/view-part/?ref=eda, Component Type=Standard, Design Item ID=10164227-1004A1RLF, MF=Amphenol, MP=101642271004A1RLF, Pin Count=100, SnapEDA_Link=https://www.snapeda.com/parts/101642271004A1RLF/Amphenol/view-part/?ref=snap, Source=10164227-1004A1RLF.SchLib
J5 J6 J7 J8: library part CMP-17439-000226-1, "Conn Shrouded Header HDR 2 POS 2.45mm Solder ST Top Entry Thru-Hole", Lead Free="Lead Free"
L1: library part CMP-02424-000082-1, "Commercial Inductors, High Saturation Series 15uH 12.5A 19.9mΩ 20%", Case/Package=6767, Current Rating=12.5A, DC Resistance (DCR)=19.9mR, Max DC Current=25A, Max Operating Temperature=125°C, Min Operating Temperature=-55°C, Package Quantity=200, Self Resonant Frequency=2MHz, Test Frequency=100kHz, Tolerance=20%, Contact Plating=Tin, Core Material=Metal, Depth=17.15mm, Height=7mm, Height - Seated (Max)=0.157inch, Inductance=15uH, Lead Free="Lead Free", Length=17.28mm, Military Standard=Not, Mount="Surface Mount", Packaging="Tape and Reel", Radiation Hardening=No, Saturation Current=25A, Shielding=Shielded, Termination=SMD/SMT, Width=0.675inch
L2: library part CMP-0007-00005-1, "Semi-shielded Power Inductor, 4.7 uH, +/- 20%, 1.4 A, -40 to 125 degC, 3 x 3 x 1.5 mm SMD, RoHS and Halogen Free, Tape and Reel", Inductance="4.7 uH", Inductance tolerance="+/- 20%", Manufacturer=Bourns, Operating Temperature="-40 to 125 degC", PartNumber=SRN3015-4R7M, Rated current="1.4 A", Resistance to Solder Heat="+260 degC for 10 sec.", ComponentLink1Description="Manufacturer URL", ComponentLink1URL=http://www.bourns.com/, ComponentLink2Description=Datasheet, ComponentLink2URL=http://www.bourns.com/data/global/pdfs/SRN3015.pdf, ComponentLink3Description="Package Specification", ComponentLink3URL=http://www.bourns.com/data/global/pdfs/SRN3015.pdf, DatasheetVersion=Aug-11, DCR Max="0.136 Ohm", Isat="1.2 A", Mounting Technology="Surface Mount", PackageDescription="2-Pin SMD, Body 3 x 3 mm, Height 1.5 mm", PackageReference=SRN3015, Packing="Tape and Reel", RoHS=TRUE, SRF Min="65 MHz"
R1 R7 R9 R10 R11 R12 R13 R14 R15 R21 R23 R24 R25 R26 R27 R28: library part RESISTOR_0_0402, "RES 0 OHM 1% 1/16W 0402", Supplier Part Number 1=13-AC0402FR-070RLCT-ND, Tolerance="+/- 1%", Value  (Ohms)=0, Made By="Robert Pafford", Supplier 1=Digikey, Wattage=1/16W
R2 R3 R16 R17: library part CMP-2002-06400-1, Manufacturer=Yageo, Part Number=RL0402JR-070R1L
R4 R5 R8 R18 R19 R20 R22 R48: library part CMP-26527-005040-1, "10Ω ±1% 0.1W 0603 Thick Film Chip Resistor AEC-Q200 compliant", Case Code (Imperial)=0603, Case Code (Metric)=1608, Max Operating Temperature=155°C, Max Power Dissipation=100mW, Min Operating Temperature=-55°C, Resistance=10, Resistor Type="Thick Film", Temperature Coefficient=100ppm/°C, Tolerance=1%, Case/Package=0603, Construction=Rectangular, Contact Plating=Tin, Depth=0.8mm, Features="Automotive AEC-Q200", Height=0.022inch, Length=1.55mm, Military Standard=Not, Mount="Surface Mount", Number of Terminations=2, Packaging="Tape and Reel", Power Rating=100mW, Radiation Hardening=No, RoHS Compliant=Yes, Series=RMCF, Width=0.031inch
R6 R33 R38 R43: library part CMP-009-00179-4, "Thick Film Surface Mount Chip Resistor, High Voltage Automotive AEC-Q200 CRHA1206AF47M0FKEF", Case/Package=1206, Manufacturer_Name=Vishay, Manufacturer_Part_Number=CRHA1206AF47M0FKEF, Power Rating=300mW, Tolerance=1%, Copyright="Copyright (C) 2026 Ultra Librarian. All rights reserved.", Datasheet=https://www.vishay.com/doc?68048, Design Item ID=CRHA1206AF47M0FKEF, Source=CRHA1206AF47M0FKEF.SchLib
R29 R34 R39 R44: library part CMP-009-00009-6, "Res Thick Film 0402 1K Ohm 1% 0.125W(1/8W) ±200ppm/C Pad SMD Automotive T/R", Case Code (Imperial)=0402, Case Code (Metric)=1005, Max Operating Temperature=155°C, Min Operating Temperature=-55°C, Power=100mW, Power Rating=125mW, Ratings=AEC-Q200, Resistance=1kΩ, Temperature Coefficient=200ppm/°C, Tolerance=1%, Voltage Rating=200V, Voltage Rating (DC)=50V, Working Voltage=75V, Case/Package=0402, China RoHS=Non-Compliant, Height=350µm, Length=1mm, Lifecycle Status=Production, Mount="Surface Mount", Mounting Technology=SM, Number of Terminals=2, Pins=2, REACH SVHC=Unaffected, RoHS=Compliant, RoHS Compliant=True, Schedule B="8533210045, 8533210045", Termination=SMD/SMT, Width=500µm
R30 R35 R40 R45: library part CMP-009-00183-1, "Res Thick Film 0603 22 Ohm 1% 0.1W(1/10W) ±100ppm/°C Pad SMD T/R Automotive AEC-Q200", Case/Package=0603, Max Operating Temperature=155°C, Min Operating Temperature=-55°C, Power Rating=100mW, Ratings=AEC-Q200, Resistance=22Ω, Temperature Coefficient=100ppm/°C, Tolerance=1%, Voltage Rating=75V, China RoHS=Non-Compliant, Composition="Thick Film", Country of Origin="Japan, Mainland China, Taiwan", Export Control Classification Number (ECCN) Code=EAR99, Harmonized Tariff Schedule (HTS) Code=8533.21.00.30, Height=450µm, Introduction Date=2011-01-31, Length=1.55mm, Lifecycle Status=Production, Mount="Surface Mount", Number of Terminals=2, REACH SVHC=Unaffected, RoHS=Compliant, Width=800µm, Working Voltage=75V
R31 R36 R41 R46: library part CMP-009-00181-2, "Res Thick Film 0603 3.3K Ohm 1% 0.2W(1/5W) ±100ppm/C Pad SMD T/R Automotive AEC-Q200 AC0603FR-7W3K3L", Case/Package=0603, Max Operating Temperature=155°C, Min Operating Temperature=-55°C, Power Rating=200mW, Ratings=AEC-Q200, Resistance=3.3kΩ, Temperature Coefficient=100ppm/°C, Tolerance=1%, Voltage Rating=75V, China RoHS=Non-Compliant, Composition="Thick Film", Height=450µm, Length=1.6mm, Lifecycle Status=Production, Mount="Surface Mount", Number of Terminals=2, Packaging="Tape & Reel", REACH SVHC=Unaffected, RoHS=Compliant, Width=800µm, Working Voltage=75V
R32 R37 R42 R47: library part CMP-009-00180-2, "Res Thick Film 0402 33K Ohm 1% 0.063W(1/16W) ±100ppm/C Epoxy Pad SMD T/R RC0402FR-1333KL Yageo Group", Case Code (Imperial)=0402, Case Code (Metric)=1005, Max Operating Temperature=155°C, Min Operating Temperature=-55°C, Power Rating=62.5mW, Resistance=33kΩ, Temperature Coefficient=100ppm/°C, Tolerance=1%, Voltage Rating=50V, Case/Package=0402, China RoHS=Non-Compliant, Composition="Thick Film", Contact Plating=Tin, Country of Origin="Mainland China, Taiwan", Export Control Classification Number (ECCN) Code=EAR99, Harmonized Tariff Schedule (HTS) Code=8533.21.00.30, Height=350µm, Introduction Date=2008-07-18, Length=1mm, Lifecycle Status=Production, Mount="Surface Mount", Number of Terminals=2, Packaging="Tape & Reel", Radiation Hardening=No, REACH SVHC=Unaffected, RoHS=Compliant, Termination=SMD/SMT, Weight=652.039032µg, Width=500µm, Working Voltage=50V
R49 R50 R51 R52: library part CMP-009-00182-1, "Fixed Resistor, Thin Film, 0.1W, 100000ohm, 75V, 0.01% +/-Tol, 15ppm/Cel, Surface Mount, 0603", Case/Package=0603, Max Operating Temperature=155°C, Min Operating Temperature=-55°C, Power Rating=100mW, Resistance=100kΩ, Temperature Coefficient=15ppm/°C, Tolerance=0.01%, Working Voltage=75V, China RoHS=Non-Compliant, Composition="Thin Film", Country of Origin="Mainland China, Taiwan", Export Control Classification Number (ECCN) Code=EAR99, Harmonized Tariff Schedule (HTS) Code=8533.21.00.30, Height=450µm, Introduction Date=2004-05-25, Length=1.6mm, Lifecycle Status=Production, Mount="Surface Mount", Number of Terminals=2, REACH SVHC=Unaffected, RoHS=Compliant, Width=800µm
R53 R54: library part CMP-03211-011351-1, "RQ73 0805 100KΩ 0.2W 10ppm/°C 0.1% 100V"
R55: library part CMP-00030-44469054-1, "MCA12060D2002BP500 SMD Chip Resistor, 20 kOhm, ± 0.1%, 250 mW, 1206 [3216 Metric], Thin Film, Precision", Case/Package=1206, Max Operating Temperature=125°C, Min Operating Temperature=-55°C, Power Rating=250mW, Resistance=20kΩ, Temperature Coefficient=25ppm/°C, Tolerance=0.1%, Voltage Rating=200V, Composition="Thin Film", Depth=1.6mm, Height=650µm, Lead Free="Lead Free", Length=3.2mm, Military Standard=Not, NexarPartId=44469054, Packaging="Tape and Reel", RoHS=Compliant, Width=1.6mm
R56: library part CMP-08839-006883-1, "Thick Film Chip Resistor, 0603, 52.3kΩ, 1%, 100ppm/°C, 0.1W, 50V"
R57: library part CMP-03211-006681-1, "CRGP 0603 22K 1%", Ambient Temperature Range High=+70°C, Manufacturer=TE, Manufacturer Part Number=CRGP0603F22K, Package=CRGP0603, Power Rating=0.25W, Resistance=22KΩ, Temperature="-55°C to +155°C", Temperature Coefficient=±100ppm/°C, Temperature Range High=+155°C, Temperature Range Low=-55°C, Tolerance=0.01, Voltage Rating=50V, Automotive=No, Category=Res, ComponentLink2Description=Datasheet, ComponentLink2URL=https://www.te.com/commerce/DocumentDelivery/DDEController?Action=srchrtrv&DocNm=9-1773463-9&DocType=DS&DocLang=English, Composition="Thick Film", Device Class L1="Passive Components", Device Class L2=Resistors, Device Class L3="Chip SMD Resistors", Digikey Description="CRGP 0603 22K 1%", Height=0.55mm, Ipc Land Pattern Name=RESC16080X45, Lead Free=Yes, Octopart=https://octopart.com/crgp0603f22k-te+connectivity-91018742, RoHS=TRUE, Series=CRGP
R58: library part CMP-03211-007818-1, "RP73P 0402 162KΩ 0.1W 25ppm/°C 0.10% 50V", Manufacturer="TE Connectivity", Manufacturer Part Number=RP73PF1E162KBTD, Package=RP73P-1E, Power Rating=0.1W, Resistance=162KΩ, Temperature="-55°C to +155°C", Temperature Coefficient=25ppm/°C, Temperature Range High=+155°C, Temperature Range Low=-55°C, Tolerance=0.10%, Voltage Rating=50V, Automotive=No, Category=Res, ComponentLink2Description=Datasheet, ComponentLink2URL=https://www.te.com/commerce/DocumentDelivery/DDEController?Action=srchrtrv&DocNm=1773272&DocType=DS&DocLang=English, Composition="Thin Film", Device Class L1="Passive Components", Device Class L2=Resistors, Device Class L3="Chip SMD Resistors", Height=0.35mm, Ipc Land Pattern Name=RESC10050X30, Lead Free=Yes, Octopart=https://octopart.com/rp73pf1e162kbtd-te+connectivity-89229970, RoHS=TRUE, Series=RP73P
R59: library part CMP-03412-040683-1, "RES 10kΩ 5.00% 0.2W 0603"
R60: library part CMP-03412-047168-1, "Anti-Sulfurated Chip Resistors Automotive Grade 20Ω 5% 200ppm/°C 0201", Case/Package=0201, Max Operating Temperature=125°C, Max Power Dissipation=50mW, Min Operating Temperature=-55°C, Resistance=20R, Resistor Type="Thick Film", Temperature Coefficient=200ppm/°C, Tolerance=5%, Features="Moisture Resistant", Height=0.01inch, Length=0.024inch, Number of Terminations=2, Packaging="Tape and Reel", RoHS Compliant=Yes, Series=AF, Width=0.012inch
U1 U2: "12 Bit, 1 MSPS, Dual, Simultaneous Sampling Single Ended / Pseudo-Differential SAR ADC 16-WQFN -40 to 125", Manufacturer=TI, Supplier Part Number 1=296-38482-1-ND, Created By="John Ulm", Max Sampling="1 MSpS", Supplier 1=DigiKey
U3 U4: library part CMP-014-00002-1, "Quad high precision, wide bandwidth, low noise operational amplifiers 14-SOIC -55 to 125", Case/Package=SOIC, Dual Supply Voltage=9V, Input Bias Current=10nA, Input Offset Voltage (Vos)=200µV, Manufacturer Lifecycle Status=ACTIVE, Max Dual Supply Voltage=18V, Max Operating Temperature=125°C, Min Dual Supply Voltage=2.5V, Min Operating Temperature=-55°C, Nominal Supply Current=3.8mA, Operating Supply Current=3.7mA, Output Current=45mA, Power Supply Rejection Ratio (PSRR)=126.02dB, Voltage Gain=160dB, Bandwidth=33MHz, Common Mode Rejection Ratio=120dB, Contact Plating=Gold, Gain Bandwidth Product=8MHz, Height=0m, Length=8.65mm, Lifecycle Status=Production, Max I/O Voltage=200µV, Max Supply Voltage=18V, Nominal Gain Bandwidth Product=33MHz, Number of Amplifiers=4, Number of Channels=4, Number of Circuits=4, Number of Elements=4, Number of Pins=14, Output Current per Channel=45mA, Radiation Hardening=No, REACH SVHC=Unaffected, RoHS=Compliant, Schedule B=8542330000, Slew Rate=11V/µs, Thickness=1.58mm, Width=3.91mm
U5: library part CMP-04918-000208-1, "IC REG BUCK PWM 600MA SOT23-6", Case/Package=SOT-23-6, Max Input Voltage=36V, Max Operating Temperature=125°C, Max Output Voltage=34.2V, Min Input Voltage=4V, Min Operating Temperature=-40°C, Min Output Voltage=1V, Output Current=600mA, Switching Frequency=1.1MHz, Features=UVLO, Mount="Surface Mount", Number of Outputs=1, Output Configuration=Positive, Output Type=PWM, Packaging="Tape and Reel", RoHS Compliant=Yes, Synchronous Rectifier=Yes
U6: library part CMP-04918-000346-1, "IC REG CTRLR"
U7: library part CMP-0758-00083-2, "Single Output Low Noise LDO, 150 mA, Fixed 5 V Output, 1.5% Tolerance, 2.2 to 16 V Input, Low IQ, 5-Pin SOT-23 (DBV), -40 to 125 degC, Green (RoHS & no Sb/Br), Tape and Reel", Manufacturer="Texas Instruments", Operating Temperature Range (degC)="-40 to 125", Accuracy (%)=1.5, ComponentLink1Description="Manufacturer URL", ComponentLink1URL=http://www.ti.com/, ComponentLink2Description=Datasheet, ComponentLink2URL=http://www.ti.com/lit/ds/symlink/lp2985-50.pdf, ComponentLink3Description="Package Specification", ComponentLink3URL=http://www.ti.com/litv/pdf/mpds018j, DatasheetVersion=SLVS522N, Fixed Output Options (V)=5, Iout (Max) (A)=0.15, Iq (Typ) (mA)=0.85, Mounting Technology="Surface Mount", Output Options="Fixed Output", PackageDescription="5-Pin Plastic Small Outline, Body 2.9 x 1.6 mm, Pitch 0.95 mm", PackageReference=DBV0005A, PackageVersion=4073253-4/L, Packing="Tape and Reel", PartNumber=LP2985-50DBVRG4, RoHS=TRUE, Vdo (Typ) (mV)=280, Vin (V)="2.2 to 16"
U8: library part CMP-0272-00842-3, "Precision, Low Noise, Low Iq Operational Amplifier, 2.2 to 5.5 V, -40 to 125 degC, 5-pin SOT23 (DBV5), Green (RoHS & no Sb/Br)", Manufacturer="Texas Instruments", Total Supply Voltage(Max)(+5V is 5, +/-5V is 10)=5.5, Total Supply Voltage(Min)(+5V is 5, +/-5V is 10)=2.2, CMRR(Min)(dB)=76, Code_JEDEC=MO-178, ComponentLink1Description="Manufacturer URL", ComponentLink1URL=http://www.ti.com/, ComponentLink2Description=Datasheet, ComponentLink2URL=http://www.ti.com/general/docs/lit/getliterature.tsp?genericPartNumber=OPA376&fileType=pdf, ComponentLink3Description="Package Specification", ComponentLink3URL=http://www.ti.com/litv/pdf/mpds018i, DatasheetVersion=SBOS406F, Eco-Plan="Green (RoHS & no Sb/Br)", IIB(Max)(pA)=10, Iq per channel(Max)(mA)=0.95, Mounting Technology="Surface Mount", Number of Channels=1, Offset Drift(Typ)(uV/C)=0.32, PackageDescription="5-Pin Plastic Small Outline, Body 1.6 x 2.9 mm, Pitch 0.95 mm", PackageReference=DBV0005A, PackageVersion="4073253-4/K, 03/2006", PartNumber=OPA376AIDBVR, Slew Rate(Typ)(V/us)=2, Sub Family="Low Input Bias Current Amp (<=10pA), Low Noise Amp (<=10nV/rtHz), Low Offset Voltage Amplifier (<=500uV), Low Supply Voltage Amplifier (<=2.7V), Precision Amplifier", Vio (25C)(Max)(mV)=0.025, Vn at 1kHz(Typ)(nV/rtHz)=7.5
U9: library part CMP-0367-00155-2, "2.5 V, 50 ppm / degC, 50 uA Series (Bandgap) Voltage Reference, -40 to 125 degC, 3-pin SOT-23 (DBZ), Green (RoHS & no Sb/Br)", Manufacturer="Texas Instruments", Rating=Catalog, Temp Coeff(Max)(ppm/ degree C)=50, Temp Coeff(Typ)(ppm/ degree C)=20, Code_JEDEC=TO-236, ComponentLink1Description="Manufacturer URL", ComponentLink1URL=http://www.ti.com/, ComponentLink2Description=Datasheet, ComponentLink2URL=http://www.ti.com/general/docs/lit/getliterature.tsp?genericPartNumber=REF3025&fileType=pdf, ComponentLink3Description="Package Specification", ComponentLink3URL=http://www.ti.com/litv/pdf/mpds108a, DatasheetVersion=SBVS032F, Eco-Plan="Green (RoHS & no Sb/Br)", Initial Accuracy @ 25/deg C(%)=0.2, Iq(Max)(uA)=50, Mounting Technology="Surface Mount", PackageDescription="3-Pin Plastic Small Outline, Body 2.92 x 1.3 mm, Pitch 0.95 mm", PackageReference=DBZ0003A, PackageVersion=4203227/B, PartNumber=REF3025AIDBZR, SubFamily="Series Voltage Reference", VI(Max)(V)=5.5, VI(Min)(V)=2.501, VO(V)=2.5

## Via types
v1: diameter 50, hole 28, Top Layer to Bottom Layer, 14 vias
v2: diameter 24.8, hole 12.99, Top Layer to Bottom Layer, 6 vias

## Nets (pads, with @x,y where several pads share a name; then routed paths per layer and width w, separated by ;. In a path a pad name is that pad's centre, name@x,y a point inside that pad or via, vN(x,y) a via of type N, cw(c..) or ccw(c..) an arc to the next point about the centre after c; other vN are vias at no path point)
3V3: C5.2 C11.2 U1.7 U2.7
6V_BUCK: C27.1 C32.1 C41.1 L1.2 R54.2 U7.1 U7.3
+5V: C46.1 U8.5
CAN_N: 
CAN_P: 
CLK: J2.34 R11.1 R25.1
"Filters 2.5V REF": C47.1 J5.2 J6.2 J7.2 J8.2 R29.2 R34.2 R39.2 R44.2 R60.2 U3.3 U3.5 U3.10 U3.12 | length 753.2
  Top Layer w9.84: U3.5 790,1995 v1(840,2045) ; U3.3 790,2095 v1(840,2045) ; U3.10 890,1995 v1(840,2045) ; U3.12 890,2095 v1(840,2045) ; v1(1265,1675) 1272.68,1682.68 1272.68,1697.37 R39.2 ; v1(1265,2410) 1265,2400.31 R44.2 ; v1(1380,1675) 1380,1679.69 R34.2 ; v1(1380,2410) 1380.31,2410 R29.2
"Filters + ADC Analog 5V": C6.2 C12.2 C14.1 C15.1 C42.1 C49.1 R1.1 R15.1 U1.14 U2.14 U3.4 U4.4 U7.5 U9.1 | length 108.3
  Top Layer w9.84: C14.1@685,2045 U3.4 ; C15.1 U4.4
GND: 1.2 C1.1 C2.1 C5.1 C6.1 C7.1 C8.1 C11.1 C12.1 C14.2 C15.2 C18.1 C21.2 C24.1 C26.2 C27.2 C30.1 C32.2 C36.1 C37.2 C38.2 C39.2 C40.2 C41.2 C42.2 C43.2 C44.1 C45.1 C46.2 C47.2 C48.2 C49.2 D1.1 D2.2 J1.7 J1.8 J1.13 J1.14 J1.19 J1.20 J1.25 J1.26 J1.31 J1.32 J1.37 J1.38 J1.44 J1.50 J1.55 J1.56 J1.61 J1.62 J1.67 J1.68 J1.73 J1.74 J1.79 J1.80 J1.85 J1.86 J1.91 J1.92 J1.97 J1.98 J2.1 J2.2 J2.7 J2.8 J2.13 J2.14 J2.22 J2.23 J2.32 J2.33 J2.42 J2.43 J2.52 J2.53 J2.59 J2.60 J2.65 J2.66 J2.71 J2.74 J2.98 R13.2 R14.2 R27.2 R28.2 R31.1 R32.1 R36.1 R37.1 R41.1 R42.1 R46.1 R47.1 R55.1 R58.1 R59.1 U1.2 U1.3 U1.13 U1.17 U2.2 U2.3 U2.13 U2.17 U3.11 U4.11 U5.2 U6.7 U6.9 U7.2 U9.3 | length 1107.5
  Top Layer w9.84: v1(550,2045) C14.2 ; v1(870,1740) R41.1 933.36,1688.28 R36.1 ; v1(870,2350) R46.1 933.36,2401.72 R31.1 ; U3.11 v1(1000,2045) C15.2 ; R37.1 1205,1713.77 1230,1738.77 v1(1230,1745) 1230,1755.87 1250,1775.87 1250,1820 1243.27,1826.73 R42.1 ; R32.1 1205,2376.23 1230,2351.23 v1(1230,2345) 1230,2334.13 1250,2314.13 1250,2269.03 1244.23,2263.27 R47.1 ; v1(1345,2045) U4.11 ; C24.1 1466.14,1908.86 1466.14,1951.14 v1(1470,1955) 1466.14,1958.86 1466.14,2001.14 C30.1 ; C36.1 1466.14,2088.86 1466.14,2131.14 v1(1470,2135) 1466.14,2138.86 1466.14,2181.14 C18.1
  other v2: 9318.82,764.41 9370,764.41 9421.18,764.41 9318.82,815.59 9370,815.59 9421.18,815.59
"J2 Connectors 5V digital pie": 1.1 C39.1 C40.1 J2.77 J2.79 J2.81 J2.83 J2.85 J2.87 L2.2 R56.2
NetC1_2: C1.2 R2.2
NetC2_2: C2.2 R3.2
NetC3_1: C3.1 R4.1 U1.16